# Altium PCB LST_UP.PcbDoc (part 5 of 6)
Units mil, origin at the board's own origin, x right, y up, seen from the top; angles counter-clockwise.
Board outline 4330.71 x 4330.71 mil, 2 copper layers (Top Layer, Bottom Layer), stack 50 mil thick; 469 components, 244 nets, 1341 pads, 140 vias.
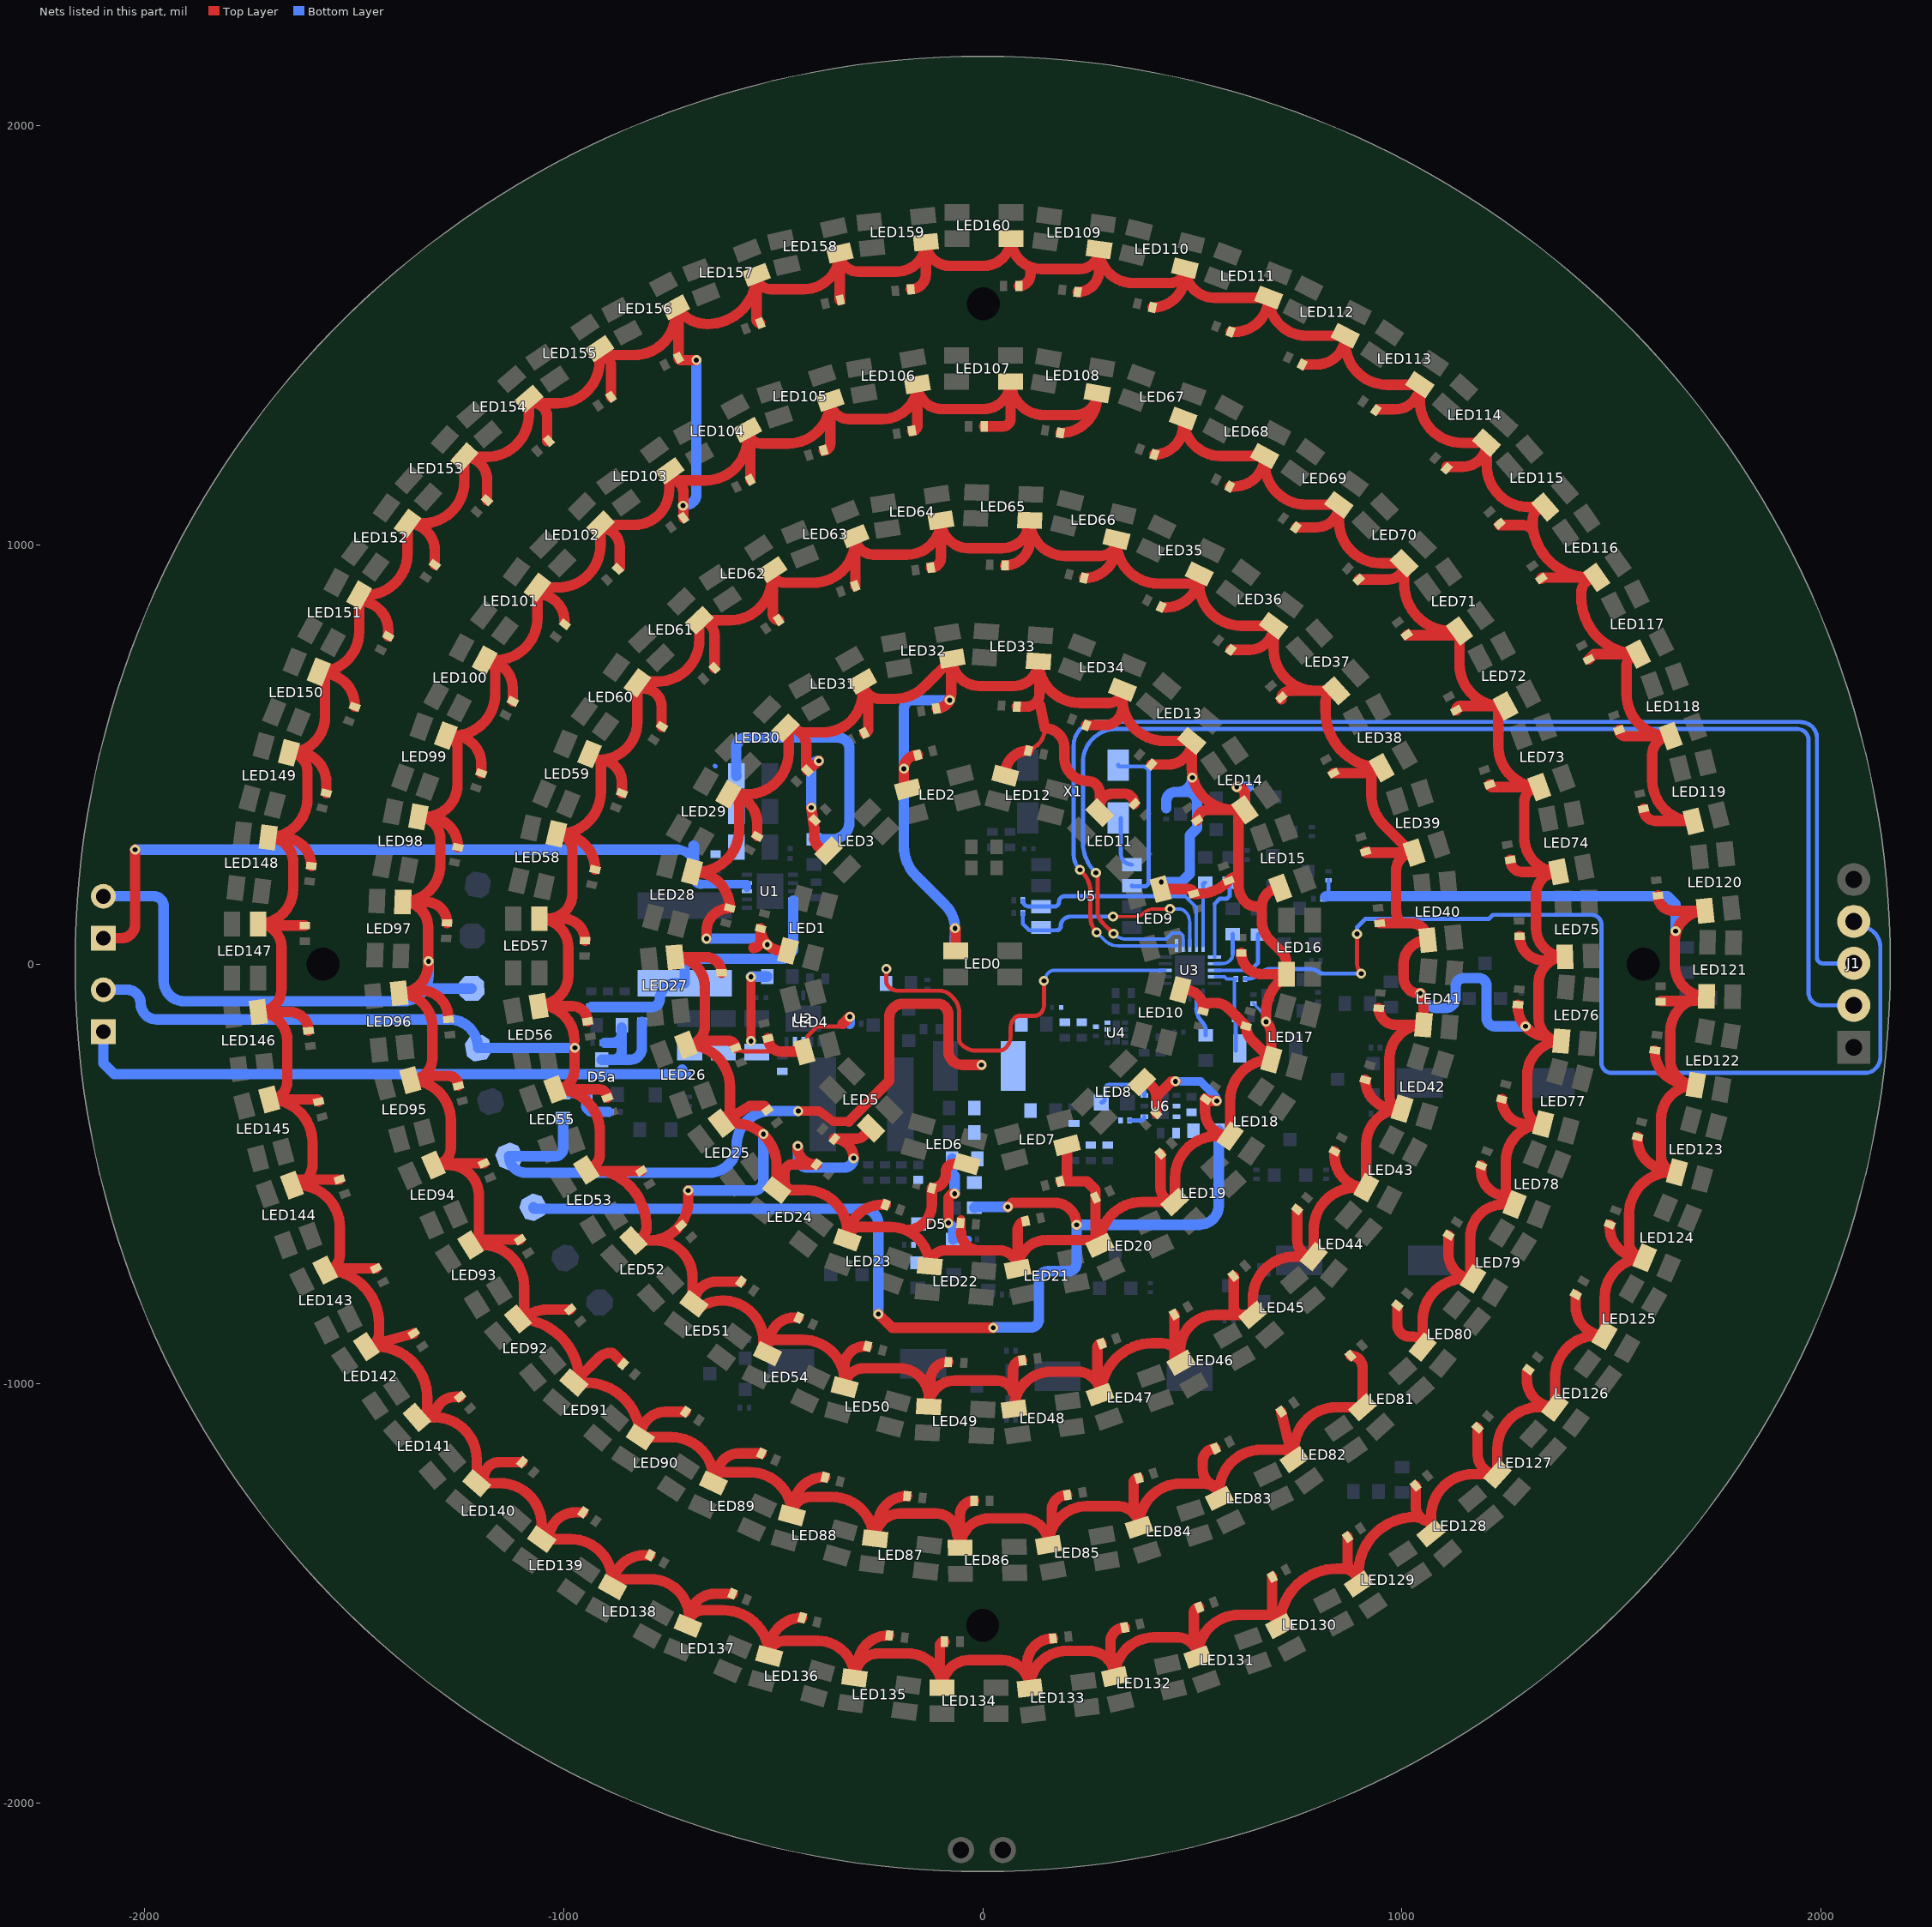
[diagram p4: the nets of this part, all layers, seen from the top]

## Via types
v1: diameter 23.62, hole 11.81, Top Layer to Bottom Layer, tented top, 92 vias
v2: diameter 23.62, hole 11.81, Top Layer to Bottom Layer, 48 vias

## Nets (pads, with @x,y where several pads share a name; then routed paths per layer and width w, separated by ;. In a path a pad name is that pad's centre, name@x,y a point inside that pad or via, vN(x,y) a via of type N, cw(c..) or ccw(c..) an arc to the next point about the centre after c; other vN are vias at no path point) (continued)
NetR23_1: R23.1 U6.4 | length 39.9
  Bottom Layer w10: R23.1@350.5,-372.28 377.2,-372.28 ccw(c377.2,-363.87) U6.4@385.61,-363.87
NetSB7_2: SB7.2 U3.8 | length 991.6
  Top Layer w10: v1@-230,-6 v1(-230,-11) -230,-39.51 ccw(c-209.51,-39.51) -224,-54 ccw(c-202.27,-32.27) -202.27,-63 -103,-63 cw(c-103,-101.63) -75.69,-74.31 -72,-78 cw(c-110.63,-116.63) -56,-116.63 -56,-178.76 ccw(c-38.93,-178.76) -51,-190.83 ccw(c-14.38,-154.22) -14.38,-206 38.1,-206 ccw(c38.1,-182.1) 55,-199 ccw(c27.07,-171.07) 66.57,-171.07 66.57,-150.77 cw(c98.77,-150.77) 76,-128 cw(c88.54,-140.54) 88.54,-122.81 123.98,-122.81 ccw(c123.98,-102.98) 138,-117 ccw(c118.69,-97.69) 146,-97.69 v1(146,-39.61)
  Bottom Layer w8: v1@150,-35.11 cw(c171,-35.11) 171,-14.11 U3.8@434.94,-14.11
  Bottom Layer w10: SB7.2@-230,-45.61 v1(-230,-11)
NetSB8_1: SB8.1 U3.2 | length 102.1
  Bottom Layer w8: 509.75,-105 U3.2@509.75,-73.16
  Bottom Layer w10: 509.75,-105 ccw(c555.01,-105) 523.01,-137 524,-138 cw(c504.69,-157.31) 532,-157.31 SB8.1@532,-169.11
NetSB9_1: SB9.1 U3.15 | length 153.1
  Bottom Layer w8: U3.15@525.5,44.95 SB9.1@525.5,189.39
  Bottom Layer w10: SB9.1@525.5,189.39 cw(c531,189.39) SB9.1@531,194.89
NetSB10_1: SB10.1 U3.16 | length 202.4
  Bottom Layer w8: U3.16@553.06,17.39 553.06,144.06
  Bottom Layer w10: 553.06,144.06 565.39,156.39 582.39,156.39 589,163 SB10.1@589,194.89
NetSB11_1: SB11.1 U3.17 | length 103.7
  Bottom Layer w8: U3.17@553.06,1.64 571.29,1.64 ccw(c571.29,28.09) 590,9.39 590.62,10.01 ; 590.63,10.02 ccw(c577.63,23) 596,23
  Bottom Layer w10: 596,23 SB11.1@596,72.39
NetSB12_1: SB12.1 U3.18 | length 175.5
  Bottom Layer w8: U3.18@555.06,-14.11 626.09,-14.11 ccw(c626.09,16.8) 647.95,-5.05
  Bottom Layer w10: 647.95,-5.05 657,4 SB12.1@657,71.39
OSC_IN: U5.1 X1.1 | length 126.5
  Bottom Layer w10: X1.1@329.54,349.39 329.54,264.17 ccw(c355.82,264.17) U5.1@355.82,237.89
OSC_OUT: U5.2 X1.4 | length 391.6
  Bottom Layer w10: X1.4@323.54,475.37 ccw(c326.91,475.37) 326.91,472 383,472 cw(c383,459) 396,459 396,196.39 cw(c385.61,196.39) 385.61,186 357.7,186 cw(c357.7,187.89) U5.2@355.82,187.89
RESET: C11.2 R19.1 SW1.1 U3.19 | length 225.8
  Bottom Layer w8: U3.19@555.06,-29.85 577.03,-29.85 581.79,-34.61 R19.1@604.17,-34.61 600.19,-38.59 600.19,-128.3 C11.2@603.5,-131.61
  Bottom Layer w10: SW1.1@603.07,-206.11 603.5,-205.68 C11.2@603.5,-131.61
RESET#: J1.4 R19.2 | length 2382.3
  Top Layer w10: v1@893,76.39 v1(893,72.39) 893,2.14 ccw(c927.14,2.14) v1(903,-22)
  Bottom Layer w10: R19.2@625.83,-34.61 630.07,-34.61 ccw(c630.07,9.62) 661.34,-21.66 cw(c687.07,-47.38) 663.11,-20 cw(c687.07,-47.38) 687.07,-11 777.2,-11 cw(c777.2,-58.8) 800.85,-17.26 ccw(c812.29,-5.82) 806.22,-20.82 ccw(c812.29,-5.82) 812.29,-22 v1(903,-22) ; v1(893,72.39) 893,88.64 912.75,108.39 1207.44,108.39 1217.2,118.15 1452.77,118.15 cw(c1452.77,94.93) 1456,117.93 cw(c1452.77,94.93) 1476,94.93 1476,-234.98 ccw(c1500,-234.98) 1500,-258.98 2109.92,-258.98 ccw(c2103,-221.24) 2141.37,-221.24 2141.37,41.02 ccw(c2092,41.02) J1.4@2092,90.39
RXD: J1.3 U3.11 | length 3109.9
  Top Layer w10: v1(232,225.39) 236.93,220.46 cw(c188.46,172) 257,172 257,112.21 ccw(c308.21,112.21) v2(272,76)
  Bottom Layer w8: v2(272,76) 290,58 ccw(c323.92,91.92) 323.92,43.95 461.5,43.95 U3.11@462.5,44.95
  Bottom Layer w10: v1(232,225.39) cw(c268.21,261.6) 217,261.6 217,522 cw(c273.39,522) 218.17,533.43 cw(c273.39,522) 261.96,577.22 cw(c273.39,522) 273.39,578.39 1953,578.39 ; 1953,577.39 cw(c1953,540.39) 1990,540.39 1990,16.39 ccw(c2004,16.39) 2004,2.39 J1.3@2078,2.39
SCL: R22.1 U3.14 U5.6 | length 538.8
  Bottom Layer w8: 483,162.63 509.75,135.89 U3.14@509.75,44.95
  Bottom Layer w10: R22.1@95.64,152.89 ccw(c110.64,152.89) 110.64,137.89 U5.6@139.28,137.89 170.5,137.89 ccw(c170.5,149.39) 182,149.39 cw(c195.24,149.39) 195.24,162.63 483,162.63
SDA: R21.1 U3.13 U5.5 | length 528.9
  Top Layer w8: v2(311,114) 364.51,114 ccw(c364.51,140.14) 383,121.66 cw(c407.97,96.69) 407.97,132 v2(447,132)
  Bottom Layer w8: v2(447,132) 468.51,132 cw(c468.51,111.51) 483,126 cw(c456.44,99.44) 494,99.44 U3.13@494,44.95
  Bottom Layer w10: R21.1@95.64,122.89 95.64,96.75 111,81.39 176.84,81.39 ccw(c176.84,90.55) 186,90.55 cw(c209.45,90.55) 209.45,114 v2(311,114)
TXD: J1.2 U3.12 | length 3152.9
  Top Layer w10: v1(270,218.39) cw(c260.34,208.73) 274,208.73 274,126.56 ccw(c311.56,126.56) 285,100 v2(312,73)
  Bottom Layer w8: v2(312,73) ccw(c343.51,104.51) 343.51,59.95 437.56,59.95 452,74.39 472,74.39 478.25,68.14 U3.12@478.25,44.95
  Bottom Layer w10: v1(270,218.39) 268.29,220.1 cw(c339,290.81) 239,290.81 239,482 cw(c318.39,482) 239.97,494.36 cw(c318.39,482) 250.23,522.7 cw(c318.39,482) 318.39,561.39 1943.51,561.39 cw(c1943.51,534.9) 1970,534.9 1970,-66.61 ccw(c2001,-66.61) 2001,-97.61 J1.2@2078,-97.61
V_BAT: P4.1 SB13.1 SB14.1 SB15.1 SB16.1 SB17.2 SB18.2 SB19.1 SW2.2 | length 1783.6
  Top Layer w22: v2(-440,-350) -390.65,-350 -356,-375 -319.73,-375
  Top Layer w25: -319.73,-375 -223,-278.27 -223,-127 cw(c-190,-127) -190,-94 -108,-94 cw(c-108,-120) -82,-120 -82,-206 ccw(c-48,-206) -48,-240 v2(-3,-240)
  Bottom Layer w25: SB16.1@-1001,-367 -1001,-439.15 cw(c-1019.47,-439.15) -1019.47,-457.61 P4.1@-1130,-457.61 ccw(c-1090.61,-457.61) -1090.61,-497 -653,-497 ccw(c-653,-431) -587.91,-441.94 ccw(c-653,-431) -587,-431 cw(c-506,-431) -561.43,-371.93 cw(c-506,-431) -506,-350 v2(-440,-350)
V_C1: D5.2 R33.2 SB15.2 | length 243
  Top Layer w25: v2@-82,-615.89 -82,-562 cw(c-67,-562) v2(-67,-547)
  Bottom Layer w10: D5.2@-70.13,-656.4 D5.2@-70.13,-656
  Bottom Layer w18: D5.2@-70.13,-656 R33.2@-34.83,-656
  Bottom Layer w25: v2@-81.5,-616.39 -70.13,-627.76 D5.2@-70.13,-656 ; SB15.2@-73,-464 -73,-499 -67,-505 v2(-67,-547)
  other v2: -82,-616.89
V_C2: D5a.2 R34a.2 SB16.2 | length 144
  Bottom Layer w25: SB16.2@-1001,-307 -949.74,-307 cw(c-949.74,-310.34) D5a.2@-946.4,-310.34 -946.4,-334.47 ccw(c-928.87,-334.47) -928.87,-352 -893,-352
V_LED_2: C20.1 C21.1 C22.1 L1.2 L7.2 U1.9 U1.10 | length 693.9
  Bottom Layer w10: C20.1@-934,-101.61 C20.1@-929.72,-105.89
  Bottom Layer w25: C20.1@-934,-101.61 C21.1@-894,-101.61 C22.1@-854,-101.61 -789.68,-101.61 ccw(c-789.68,-81.93) -770,-81.93 cw(c-733.21,-81.93) -733.21,-45.15 L1.2@-711,-45.15 -711,-5 -693,13 -473.39,13 -452.38,34.01 U1.10@-452.38,135.03 U1.9@-452.38,151.71
V_MCU: C23.1 C24.1 L4.2 R20.2 U4.7 U4.8
V_O1: C191.2 D5.3 L6.1 R34.2
V_O2: C192a.2 D5a.3 L7.1 R35a.2 | length 320.6
  Bottom Layer w25: D5a.3@-909,-227.66 -882.78,-227.66 ; -902,-187 -882,-187 ; -878,-187 -880,-187 -882,-187 ; C192a.2@-861,-151 -861,-166 ; L7.1@-813,-137 -813,-199.46 cw(c-841.2,-199.46) -841.2,-227.66 -882.78,-227.66 ; -882.78,-227.66 ccw(c-882.78,-205.88) -861,-205.88 -861,-166 ; -882,-187 ccw(c-882,-166) -861,-166
V_OUT_1: C4.2 C5.2 C6.2 R15.2 R18.1 SB6.1 U2.3 U2.4 | length 1677
  Top Layer w22: v2@-553,-182 v2(-553,-29.85)
  Bottom Layer w10: R15.2@-514.1,-29 R15.2@-514,-29.1
  Bottom Layer w25: SB6.1@-2098,-160.61 -2098,-236 -2072,-262 -707,-262 ; -717,-250.61 -717,-252.61 ccw(c-713,-252.61) -713,-256.61 ; v2(-553,-29.85) -552.25,-29.1 R15.2@-514,-29.1
  other v2: -553,-183
V_OUT_2: C1.2 C2.2 C3.2 R13.2 R17.1 SB5.1 U1.3 U1.4 | length 2512.5
  Top Layer w25: SB5.1@-2098,62.39 -2054.91,62.39 ccw(c-2054.91,95.3) -2022,95.3 v1(-2022,273.39)
  Bottom Layer w10: -639,473.89 ccw(c-637.5,473.89) -637.5,472.39 ; R13.2@-402.5,298.4 ccw(c-394.49,298.4) R13.2@-394.49,290.39
  Bottom Layer w20: -671.71,191.08 -562.62,191.08 -562.62,183
  Bottom Layer w22: -727.39,273.39 cw(c-727.39,235) -689,235 -689,208.37 ccw(c-671.71,208.37) -671.71,191.08
  Bottom Layer w25: v1(-2022,273.39) -727.39,273.39 ; -690,283 cw(c-690,282) -689,282 -689,235 ; C3.2@-587.5,449.4 -588,449.4 -588,518.06 cw(c-565.06,518.06) -565.06,541 -345.2,541 cw(c-345.2,513.8) -318,513.8 -318,339 cw(c-358.6,339) -358.6,298.4 R13.2@-402.5,298.4
V_TR: C14.1 C15.1 C16.1 L5.2 L9.1 R23.2 U6.6 | length 158.3
  Bottom Layer w10: L9.1@283.09,-329.61 ccw(c283.09,-321.7) 291,-321.7 291,-298.61 cw(c302,-298.61) 302,-287.61 378.22,-287.61 cw(c378.22,-295) 385.61,-295 U6.6@385.61,-312.69
V_TR_O: C28.2 C29.2 SB20.1 U6.2 U6.3
VCC: P6.1 SB19.2 SB20.2 | length 2591.2
  Top Layer w10: -6,-867 ccw(c-6,-866) -5,-866
  Top Layer w25: v2(-249,-834) -216,-867 -6,-867 v2(25,-867) ; v1(60,-578.61) 70,-568.61 171.07,-568.61 cw(c171.07,-621.54) v1(224,-621.54)
  Bottom Layer w10: v2(25,-867) cw(c26,-867) v2@26,-866
  Bottom Layer w25: P6.1@-1072,-579.61 ccw(c-1068.61,-579.61) -1068.61,-583 -285,-583 cw(c-285,-619) -249,-619 v2(-249,-834) ; SB19.2@-20,-580.61 -18,-578.61 v1(60,-578.61) ; v2@26,-866 115,-866 ccw(c115,-847) 134,-847 134,-754 cw(c156,-754) 156,-732 205,-732 ccw(c205,-713) 224,-713 v1(224,-621.54) 517.03,-621.54 517.96,-620.61 ccw(c517.96,-575.57) 563,-575.57 SB20.2@563,-396.61
VCC_L1: C30.2 C31.2 C32.2 C33.2 C34.2 C35.2 C36.2 C37.2 C38.2 C39.2 C40.2 C41.2 C42.2 C43.2 C44.2 C45.2 C46.2 C47.2 C48.2 C49.2 C50.2 C51.2 C52.2 C53.2 C54.2 C55.2 C56.2 C57.2 C58.2 C59.2 C60.2 C61.2 C62.2 C63.2 C64.2 C65.2 C66.2 C67.2 C68.2 C69.2 C70.2 C71.2 C72.2 C73.2 C74.2 C75.2 C76.2 C77.2 C78.2 C79.2 C80.2 C81.2 C82.2 C83.2 C84.2 C85.2 C86.2 C87.2 C88.2 C89.2 C90.2 C91.2 C92.2 C93.2 C94.2 C95.2 C96.2 C97.2 C98.2 C99.2 C100.2 C101.2 C102.2 C103.2 C104.2 C105.2 C106.2 C107.2 C108.2 C109.2 C190.2 LED0.1 LED1.1 LED2.1 LED3.1 LED4.1 LED5.1 LED6.1 LED7.1 LED8.1 LED9.1 LED10.1 LED11.1 LED12.1 LED13.1 LED14.1 LED15.1 LED16.1 LED17.1 LED18.1 LED19.1 LED20.1 LED21.1 LED22.1 LED23.1 LED24.1 LED25.1 LED26.1 LED27.1 LED28.1 LED29.1 LED30.1 LED31.1 LED32.1 LED33.1 LED34.1 LED35.1 LED36.1 LED37.1 LED38.1 LED39.1 LED40.1 LED41.1 LED42.1 LED43.1 LED44.1 LED45.1 LED46.1 LED47.1 LED48.1 LED49.1 LED50.1 LED51.1 LED52.1 LED53.1 LED54.1 LED55.1 LED56.1 LED57.1 LED58.1 LED59.1 LED60.1 LED61.1 LED62.1 LED63.1 LED64.1 LED65.1 LED66.1 LED67.1 LED68.1 LED69.1 LED70.1 LED71.1 LED72.1 LED73.1 LED74.1 LED75.1 LED76.1 LED77.1 LED78.1 LED79.1 LED80.1 P1.1 R1.1 R3.1 R5.1 RU1.1 SB6.2 | length 31605
  Top Layer w10: C55.2@-589.63,-199.34 ccw(c-569.66,-179.37) -569.66,-207.61 -507.99,-207.61 ccw(c-507.99,-192.53) -497.33,-203.19 ; LED4.1@-418.92,-208.03 -418.92,-172.53 -402.34,-155.96 ; -402.3,-155.96 -394.34,-148 -340.39,-148 -334,-141.61 ; 94.95,509.71 ccw(c94.95,563.08) 148.32,563.08
  Top Layer w22: -51.43,-639.57 C51.2@-51.43,-609 ; 83.38,-630.98 cw(c101.9,-630.98) C50.2@101.9,-612.46
  Top Layer w25: LED56.1@-1059.16,-99.64 -1036.76,-99.64 ; v2@-974,-199 -974,-252.44 cw(c-1019.86,-252.44) LED55.1@-1019.86,-298.3 LED55.1@-1013.55,-298.3 ; -974,-181.8 ccw(c-1059.16,-181.8) -1036.76,-99.64 ; C86.2@-948.71,56.92 ccw(c-1000.74,56.92) -1000.74,108.96 LED57.1@-1038.43,108.96 ; C85.2@-942.43,-136.17 ccw(c-978.96,-136.17) -978.96,-99.64 -1036.76,-99.64 ; C87.2@-924.68,226.44 ccw(c-1009.54,226.44) -1009.54,311.31 LED58.1@-1011,311.31 ; C84.2@-895.33,-318.23 ccw(c-915.25,-318.23) -915.25,-298.3 LED55.1@-1013.55,-298.3 ; C88.2@-860.77,408.42 -860.77,434.23 ccw(c-914.62,434.23) -914.62,488.08 ; LED60.1@-823.89,671.34 -823.89,578.81 cw(c-914.62,578.81) -914.62,488.08 ; C83.2@-814.61,-492.94 -899.91,-492.94 ; C89.2@-766.18,567.3 -766.18,615.03 ccw(c-809,615.03) -809,657.85 ccw(c-825.75,657.85) -825.75,674.6 -775.95,674.6 ccw(c-775.95,774.6) -675.95,774.6 LED61.1@-675.95,820.87 ; LED26.1@-708.1,-192.19 -703,-192.19 cw(c-703,-292.19) -603,-292.19 -603,-348.2 cw(c-618.66,-348.2) -603.11,-350.04 cw(c-618.66,-348.2) LED25.1@-618.66,-363.86 ; v2(-702.59,-539.69) -702.59,-565.41 cw(c-796,-565.41) -796,-658.82 ; LED28.1@-693.25,220.71 LED28.1@-690,220.71 ; LED51.1@-674,-817.61 cw(c-620.77,-899.57) LED54.1@-525.7,-922.19 ; v1(-659,61.39) -659,78.55 cw(c-603.42,78.55) C57.2@-603.42,134.13 ccw(c-690,134.13) LED28.1@-690,220.71 ; C90.2@-639.69,707.07 -639.69,784.61 ccw(c-675.95,784.61) LED61.1@-675.95,820.87 ; LED25.1@-623.02,-379.33 -556,-337.61 -521,-337.61 ; C56.2@-622.97,-20.14 ccw(c-660.27,-20.14) -660.27,17.17 LED27.1@-733.82,17.17 cw(c-733.82,-53.65) -663,-53.65 -663,-147.08 cw(c-708.1,-147.08) -679.89,-182.27 -606.7,-182.27 cw(c-606.7,-199.34) C55.2@-589.63,-199.34 ; LED25.1@-605,-379.33 -591.73,-379.33 cw(c-591.73,-479.33) -491.73,-479.33 LED24.1@-491.73,-538.35 -452,-538.35 ; C81.2@-576.82,-757 -635.93,-757 ccw(c-635.93,-809.91) LED51.1@-688.85,-809.91 -692.32,-806.44 -692.32,-746.93 ccw(c-780.44,-746.93) -780.44,-658.82 -796,-658.82 ; -547,39.39 ccw(c-547,56.26) -530.13,56.26 C32.2@-530.13,85.52 ccw(c-476.68,85.52) -476.68,32.07 LED1.1@-464.75,32.07 ; C58.2@-538,306.39 -538,336.87 ccw(c-606.56,336.87) LED29.1@-606.56,405.43 ; LED54.1@-521.4,-924.35 cw(c-492.66,-924.35) -507.83,-899.94 ; C33.2@-512,-176.61 ccw(c-480.58,-176.61) -497.33,-203.19 ccw(c-480.58,-176.61) -480.58,-208.03 LED4.1@-425.33,-208.03 ; C91.2@-486.58,821.47 cw(c-486.58,835.79) -500.91,835.79 LED62.1@-500.91,929.69 ; v1(-441,-433.61) ccw(c-441,-434.61) -442,-434.61 ccw(c-399.39,-434.61) C53.2@-399.39,-477.22 ; C80.2@-438.77,-842.79 -450.68,-842.79 ccw(c-450.68,-899.94) -507.83,-899.94 ; C59.2@-420.92,466.51 -420.92,521.93 ccw(c-463.04,521.93) -435.03,553.39 ; C59.2@-418.25,462.47 v1(-391,485.39) ; v1(-409,374) -404.47,343.42 -401.6,323.98 -402.08,305.16 ccw(c-367.65,305.16) LED3.1@-367.65,270.73 LED3.1@-367.65,273.46 ; C53.2@-396.58,-477.22 C53.2@-399.39,-477.22 ; -334,-141.61 -333.61,-141.61 v1(-317,-125) ; v1(-308,-462.61) ccw(c-354.92,-462.61) -354.92,-415.69 -300.93,-415.69 ccw(c-300.93,-390.57) -275.81,-390.57 LED5.1@-266.34,-390.57 ; C92.2@-304,902.39 -304,1010.39 LED63.1@-304.48,1010.39 ; C60.2@-282.52,551.79 ccw(c-282.52,561.05) -273.26,561.05 -273.26,644.38 ; C79.2@-274.87,-911.21 -282.39,-911.21 ccw(c-282.39,-958.62) -329.8,-958.62 -329.8,-985.81 ; C52.2@-231.38,-573.28 -239.02,-573.28 ccw(c-239.02,-657.3) LED23.1@-323.04,-657.3 ; LED2.1@-177.42,417.72 cw(c-177.42,428.3) -188,428.3 v1(-188,466.47) cw(c-154.87,466.47) C30.2@-154.87,499.6 ; -128.22,-1034.61 ccw(c-199.22,-1034.61) -199.22,-963.61 -284.07,-963.61 ccw(c-284.07,-1008.86) LED50.1@-329.32,-1008.86 -329.32,-995.61 ccw(c-429.32,-995.61) -329.8,-985.81 ; C93.2@-123.77,946.28 ccw(c-123.77,970.37) -99.68,970.37 LED64.1@-99.68,1058.77 ; C61.2@-110.63,610.6 ccw(c-110.63,646.23) v1(-78.78,630.28) ; C78.2@-82,-948.61 ccw(c-82,-991.03) -124.42,-991.03 -124.42,-1032.04 cw(c-66.29,-1055.17) -66.29,-992.61 34,-992.61 cw(c34,-1032.61) 72.3,-1021.07 72.3,-966.82 cw(c94.36,-966.82) C77.2@94.36,-944.76 ; v1@-81,631.39 ccw(c-79.89,631.39) -79.89,630.28 v1(-78.78,630.28) ; v2(-66,86) cw(c-69.46,82.54) -64.57,82.54 LED0.1@-64.57,32.1 ; -51.43,-639.57 ccw(c-9,-639.57) -9,-682 ; LED6.1@-38.29,-476.3 -69.69,-476.3 ccw(c-69.69,-494.61) -88,-494.61 -88,-500.49 cw(c-121.22,-500.49) C35.2@-121.22,-533.71 -121.22,-571.94 cw(c-183.37,-571.94) -183.37,-634.09 ; C94.2@53.49,951.74 ccw(c53.49,1010.7) 112.44,1010.7 LED65.1@112.44,1059.05 ; LED12.1@58,454.46 cw(c53.68,454.46) LED12.1@53.68,450.14 53.68,454.45 cw(c108.95,454.45) C41.2@108.95,509.71 ; LED48.1@74.73,-1060.8 cw(c163.92,-1060.8) 163.92,-971.61 225.83,-971.61 cw(c225.83,-1027.47) 273.41,-998.2 ; C62.2@81.45,614.78 104.51,614.78 ccw(c104.51,645.89) 124.38,621.95 ccw(c104.51,645.89) 135.63,645.89 135.63,701.2 ; 83.38,-630.98 LED21.1@83.38,-726.61 ; 137,618.39 148.32,563.08 cw(c148.32,516.4) 178,552.43 cw(c148.32,516.4) 195,516.4 195,492.39 ccw(c250,492.39) 250,437.39 cw(c250,408.05) 279.34,408.05 LED11.1@279.34,376.45 ; LED7.1@201,-431.61 201,-501.69 cw(c184.87,-501.69) C36.2@184.87,-517.82 248.82,-517.82 269.23,-538.23 C49.2@269.23,-556.43 LED20.1@269.23,-655.32 ; C95.2@242,921.39 ccw(c242,998.51) 319.12,998.51 LED66.1@319.12,1008.39 ; C63.2@247.15,570.46 291,570.46 ccw(c291,612.67) 333.21,612.67 333.21,633.06 ccw(c433.21,633.06) 433.21,533.06 LED13.1@498.47,533.06 ; LED20.1@266.5,-657.87 152.12,-657.87 ccw(c152.12,-726.61) LED21.1@83.38,-726.61 ; LED20.1@279.34,-666.9 cw(c379.34,-666.9) 379.34,-566.9 LED19.1@458.57,-566.9 ; LED11.1@282.77,362.04 LED11.1@279.34,362.04 LED11.1@279.34,376.45 ; C76.2@283.62,-904.94 ccw(c283.62,-915.15) 273.41,-915.15 273.41,-998.2 ; LED66.1@319.12,1014.59 LED66.1@319.12,1012.51 ; LED34.1@333.21,655.36 cw(c301.24,655.36) 301.24,623.39 232.71,623.39 cw(c232.71,722.86) 135.63,701.2 ; C40.2@361.84,382.8 ccw(c337.53,382.8) 337.53,407.11 310,407.11 ccw(c310,376.45) LED11.1@279.34,376.45 ; LED8.1@379.65,-280.95 cw(c379.65,-315.38) 414.08,-315.38 ; C42.2@402.17,476.5 441.91,476.5 ccw(c441.91,533.06) LED13.1@498.47,533.06 ; C96.2@409.38,1216.18 ccw(c409.38,1284.83) 478.04,1284.83 LED67.1@478.04,1302.08 ccw(c567.5,1302.08) 567.5,1212.62 LED68.1@672.41,1212.62 ; C37.2@414.08,-355.53 414.08,-315.38 ; C48.2@423.94,-452.61 423.94,-532.27 ccw(c458.57,-532.27) LED19.1@458.57,-566.9 ; LED9.1@426,179.37 492.18,179.37 cw(c492.18,168.13) C39.2@503.42,168.13 513.74,168.13 ccw(c513.74,268.13) 584.45,197.42 C44.2@586.65,199.62 587.87,200.83 cw(c610,178.7) 610,210 ; 436,851.39 436.66,851.39 ccw(c436.66,931.13) LED35.1@516.4,931.13 ; C75.2@456.96,-835.11 456.96,-915.02 ; v1(460,-279) 450.46,-279 414.08,-315.38 ; LED10.1@471.75,-60.72 482.17,-60.72 cw(c482.17,-104.34) C38.2@525.79,-104.34 ; C43.2@511.61,342.5 cw(c537.77,342.5) 537.77,368.66 598.47,368.66 cw(c598.47,468.66) 498.47,468.66 LED13.1@498.47,533.06 ; 525.79,-100.58 cw(c546.51,-121.31) 546.51,-92 555.37,-92 cw(c555.37,-134.74) 585.59,-104.52 C46.2@628.42,-147.35 ccw(c676.29,-147.35) 642.44,-181.19 LED17.1@688.49,-227.24 ; C47.2@530.39,-320.76 530.39,-350.12 ccw(c589.98,-350.12) LED18.1@589.98,-409.71 ; C47.2@535.23,-325.61 v1(558.39,-325.61) ; C97.2@589.33,1139.7 599.5,1139.7 ccw(c599.5,1212.62) LED68.1@672.41,1212.62 ; C65.2@591.77,750.39 636.54,750.39 ccw(c636.54,807.69) LED36.1@693.85,807.69 ; C74.2@598.74,-743.61 598.74,-816.03 ccw(c619,-816.03) LED45.1@619,-836.29 ; v1(606,423.39) cw(c606,403.83) 625.56,403.83 LED14.1@625.56,368.66 ccw(c625.56,359.1) LED14.1@616,359.1 ; 610,355 610,210 ; C45.2@617,26.89 ccw(c667.63,26.89) 624.78,-0.07 ccw(c667.63,26.89) 667.63,-23.74 LED16.1@724.8,-23.74 ; LED15.1@709.86,182.08 ccw(c709.86,138.16) 665.94,138.16 ; C66.2@712.38,632.26 cw(c732.72,632.26) 732.72,652.6 793.85,652.6 ; C98.2@748.16,1042.52 796.19,1042.52 ccw(c796.19,1096.28) LED69.1@849.95,1096.28 ; C73.2@750.11,-587.87 750.11,-657.52 ccw(c789.67,-657.52) LED44.1@789.67,-697.08 ; C67.2@836.97,456.21 927.43,456.21 927.43,403.36 ccw(c1027.43,403.36) 956.72,332.65 1023,266.37 916.14,266.37 cw(c916.14,268.8) C68.2@913.72,268.8 ; C72.2@839.31,-445.94 839.31,-456.93 ccw(c915,-456.93) LED43.1@915,-532.61 ; C99.2@897.08,918.05 966.97,918.05 ccw(c966.97,956.74) LED70.1@1005.66,956.74 1005.66,907.05 ccw(c1117.61,907.05) LED71.1@1117.61,795.1 ; C71.2@913,-275.61 ccw(c981.65,-275.61) 981.65,-344.26 LED42.1@1000.38,-344.26 ; C70.2@945,-104.75 ccw(c984.47,-104.75) 984.47,-144.22 1024.52,-144.22 ; C69.2@946.93,97.99 994.96,97.99 ; LED38.1@952.1,468.84 cw(c952.1,602.94) 818,602.94 818,627.51 cw(c843.09,627.51) LED37.1@843.09,652.6 793.85,652.6 ; C109.2@989.36,-816.59 989.36,-859.99 ccw(c1017,-859.99) 1017,-887.63 1024.2,-887.63 cw(c1024.2,-912.82) LED80.1@1049.39,-912.82 1049.39,-849.88 cw(c1149.39,-849.88) 1149.39,-749.88 LED79.1@1169.41,-749.88 ; LED70.1@998.35,956.74 949.95,956.74 cw(c949.95,1056.74) 849.95,1056.74 LED69.1@849.95,1096.28 ; C100.2@1011.87,785.15 1127.46,785.15 ccw(c1127.46,795.1) LED71.1@1137.4,795.1 1137.4,716.19 ccw(c1237.4,716.19) LED72.1@1237.4,616.19 ; LED39.1@1029.37,266.37 ccw(c1029.37,223) 986,223 986,133.74 ccw(c1061.82,133.74) 994.96,97.99 ; C108.2@1111.39,-646.99 1111.39,-691.87 ; C101.2@1129.69,606.06 cw(c1139.82,606.06) 1139.82,616.19 LED72.1@1237.4,616.19 ; C107.2@1189.07,-480.18 1189.07,-492.92 ccw(c1248,-492.92) 1248,-551.85 ; C102.2@1209.33,429.01 ccw(c1215.25,429.01) 1215.25,423.08 LED73.1@1327.86,423.08 ; C106.2@1238.21,-321.8 ccw(c1297.34,-321.8) 1297.34,-380.93 LED77.1@1337.25,-380.93 ; C103.2@1258.53,249.23 ccw(c1287.24,249.23) 1287.24,220.52 LED74.1@1373.94,220.52 ; C105.2@1276.77,-96.14 1276.77,-101.56 ccw(c1346.87,-101.56) 1346.87,-171.66 ; C104.2@1280.65,66.9 ccw(c1338.1,66.9) 1338.1,9.45 1357.82,9.45 ; LED57.1@-1038.43,108.96 ccw(c-1038.43,168.39) -979,168.39 -979,273.13 ccw(c-1017.17,273.13) LED58.1@-1017.17,311.31 LED58.1@-1011,311.31 ; LED57.1@-1038.43,108.96 LED57.1@-1057.9,108.96 cw(c-1057.9,39.66) -988.6,39.66 -988.6,-26.07 cw(c-1059.16,-26.07) -1059.16,-96.64 cw(c-1059.16,-181.8) -1036.76,-99.64 ; LED55.1@-1013.55,-298.3 cw(c-1013.55,-398.3) -913.55,-398.3 -913.55,-453.08 cw(c-946.84,-453.08) -946.84,-486.37 ccw(c-940.27,-486.37) -940.27,-492.94 -899.91,-492.94 ; LED58.1@-1011,311.31 ccw(c-1011,411.31) -911,411.31 -911,474.53 ccw(c-938.14,474.53) -914.62,488.08 ; -899.91,-492.94 cw(c-942.35,-626.73) -802,-626.73 cw(c-834.09,-626.73) -834.09,-658.82 -796,-658.82 ; LED28.1@-690,220.71 -681.08,220.71 ccw(c-681.08,320.71) -581.08,320.71 -581.08,379.94 ccw(c-606.56,379.94) LED29.1@-606.56,405.43 ; LED61.1@-675.95,820.87 -602.91,820.87 ccw(c-602.91,920.87) -502.91,920.87 -502.91,940.47 ccw(c-472.83,940.47) LED62.1@-500.91,929.69 ; LED29.1@-606.56,405.43 -563.04,405.43 ccw(c-563.04,505.43) -463.04,505.43 -463.04,564.05 cw(c-463.04,521.93) -435.03,553.39 ; -507.83,-899.94 cw(c-492.66,-924.35) -492.66,-895.61 -429.32,-895.61 cw(c-429.32,-995.61) -329.8,-985.81 ; LED62.1@-500.91,929.69 ccw(c-472.83,940.47) -472.83,910.39 -404.48,910.39 ccw(c-404.48,1010.39) LED63.1@-304.48,1010.39 ; -452,-538.35 cw(c-452,-517.58) -472.77,-517.58 -472.77,-496.29 cw(c-453.7,-496.29) -453.7,-477.22 C53.2@-399.39,-477.22 ; -452,-538.35 -423.04,-538.35 cw(c-423.04,-638.35) -323.04,-638.35 LED23.1@-323.04,-657.3 ; -435.03,553.39 -381,553.39 ccw(c-381,647.86) -286.53,647.86 LED31.1@-286.53,674.74 ccw(c-245.18,674.74) -273.26,644.38 ; LED23.1@-323.04,-657.3 cw(c-292.35,-657.3) -292.35,-626.61 -220,-626.61 cw(c-220,-720) -183.37,-634.09 ; LED63.1@-304.48,1010.39 LED63.1@-304.48,1021.74 ccw(c-260.13,1021.74) -260.13,977.39 -181.06,977.39 ccw(c-181.06,1058.77) LED64.1@-99.68,1058.77 ; -273.26,644.38 ccw(c-245.18,674.74) -245.18,633.39 -210.02,633.39 ccw(c-210.02,733.39) -139.31,662.68 LED32.1@-73.01,728.97 ; -183.37,-634.09 cw(c-220,-720) -167.3,-642.9 cw(c-220,-720) LED22.1@-126.61,-720 cw(c-88.61,-720) -88.61,-682 -9,-682 ; LED64.1@-99.68,1058.77 ccw(c-33.55,1058.77) -33.55,992.64 46.03,992.64 ccw(c46.03,1059.05) 105.93,1030.38 105.93,1052.54 cw(c112.44,1052.54) LED65.1@112.44,1059.05 ; v1(-78.78,630.28) ccw(c-110.63,646.23) -75,646.23 -75,709.57 ccw(c-168.6,728.97) LED32.1@-73.01,728.97 ; LED32.1@-73.01,728.97 ccw(c-8.08,728.97) -8.08,664.04 74.42,664.04 ccw(c74.42,722.86) LED33.1@133.24,722.86 ccw(c232.71,722.86) 135.63,701.2 ; -9,-682 38.77,-682 cw(c38.77,-726.61) LED21.1@83.38,-726.61 ; LED65.1@112.44,1059.05 ccw(c197.11,1059.05) 197.11,974.39 281,974.39 ccw(c281,1012.51) LED66.1@319.12,1012.51 ; 273.41,-998.2 cw(c225.83,-1027.47) 281.69,-1027.47 cw(c405.55,-1027.47) 405.55,-903.61 426.37,-903.61 cw(c426.37,-950.31) 456.96,-915.02 ; LED66.1@319.12,1008.39 ccw(c419.12,1008.39) 419.12,908.39 493.66,908.39 ccw(c493.66,931.13) LED35.1@516.4,931.13 ; LED66.1@319.12,1008.39 LED66.1@319.12,1012.51 ; 456.96,-915.02 456.96,-934.2 ccw(c473.06,-934.2) LED46.1@473.06,-950.31 cw(c473.06,-948.24) 471,-948.24 471,-920.61 cw(c555.32,-920.61) 555.32,-836.29 LED45.1@619,-836.29 ; LED19.1@458.57,-566.9 458.57,-509.71 cw(c558.57,-509.71) 558.57,-409.71 LED18.1@589.98,-409.71 ; LED35.1@516.4,931.13 516.4,907.69 ccw(c616.4,907.69) 616.4,807.69 LED36.1@693.85,807.69 ; LED18.1@589.98,-409.71 589.98,-325.76 cw(c688.49,-325.76) LED17.1@688.49,-227.24 ; 610,210 610,189.76 ccw(c668.53,189.76) 627.14,148.38 ccw(c651.81,173.04) 651.81,138.16 665.94,138.16 ; LED45.1@619,-836.29 LED45.1@644.55,-836.29 644.55,-797.08 cw(c744.55,-797.08) 744.55,-697.08 LED44.1@789.67,-697.08 ; 665.94,138.16 665.94,104 ccw(c730.97,104) 684.99,58.01 713,30 cw(c684.52,1.52) 724.8,1.52 LED16.1@724.8,-23.74 ; LED68.1@672.41,1212.62 672.41,1196.28 ccw(c772.41,1196.28) 772.41,1096.28 LED69.1@849.95,1096.28 ; LED17.1@688.49,-227.24 688.49,-167.16 ccw(c645.84,-167.16) v2(676,-137) 676,-113.96 cw(c776,-113.96) 705.29,-43.25 LED16.1@724.8,-23.74 ; LED36.1@693.85,807.69 693.85,752.6 ccw(c793.85,752.6) 793.85,652.6 ; LED44.1@789.67,-697.08 789.67,-632.61 cw(c889.67,-632.61) 889.67,-532.61 LED43.1@915,-532.61 ; LED43.1@915,-532.61 915,-429.64 cw(c1000.38,-429.64) LED42.1@1000.38,-344.26 ; 994.96,97.99 1021.75,97.99 cw(c1021.75,57.93) LED40.1@1061.82,57.93 ccw(c1061.82,0.11) 1004,0.11 1004,-30.31 ccw(c1044.97,-30.31) 1016,-59.28 ccw(c1039.82,-35.46) 1039.82,-69.15 v1(1044,-69.15) cw(c1026.16,-86.98) 1051.39,-86.98 LED41.1@1051.39,-144.22 1024.52,-144.22 ; LED42.1@1000.38,-344.26 cw(c1000.38,-314.25) 970.37,-314.25 970.37,-225.24 cw(c1051.39,-225.24) 1034.7,-145.96 cw(c1034.7,-115.25) 1024.52,-144.22 ; 1111.4,-692.87 ccw(c1169.41,-691.87) LED79.1@1169.41,-749.88 ; 1111.4,-692.87 cw(c1169.41,-691.87) 1111.39,-691.87 ; 1111.39,-692.87 1111.39,-691.87 ; LED79.1@1169.41,-749.88 cw(c1169.41,-743.48) 1163,-743.48 1163,-651.61 cw(c1241.79,-651.61) 1241.79,-572.82 LED78.1@1268.98,-572.82 cw(c1268.98,-551.85) 1248,-551.85 ; LED72.1@1237.4,616.19 LED72.1@1247.08,616.19 ccw(c1247.08,599.11) 1230,599.11 1230,520.94 ccw(c1327.86,520.94) LED73.1@1327.86,423.08 ; 1248,-551.85 1248,-470.17 cw(c1337.25,-470.17) LED77.1@1337.25,-380.93 ; LED73.1@1327.86,423.08 ccw(c1327.86,387.22) 1292,387.22 1292,302.46 ccw(c1373.94,302.46) LED74.1@1373.94,220.52 ; LED77.1@1337.25,-380.93 cw(c1337.25,-342.68) 1299,-342.68 1299,-264.61 cw(c1380.39,-264.61) LED76.1@1380.39,-183.22 cw(c1380.39,-128.83) 1346.87,-171.67 ; 1346.87,-171.67 cw(c1380.39,-128.83) 1326,-128.83 1326,-45.39 cw(c1389.17,-45.39) 1357.82,9.45 ; 1357.82,9.45 cw(c1389.17,-45.39) LED75.1@1389.17,17.78 cw(c1389.17,86.95) 1320,86.95 1320,166.58 cw(c1373.94,166.58) LED74.1@1373.94,220.52
  Bottom Layer w8: RU1.1@646,-93.65 676,-123.65 v2(676,-137)
  Bottom Layer w20: v1(460,-279) 520,-279 552.58,-311.58 cw(c538.54,-325.61) v1(558.39,-325.61)
  Bottom Layer w25: SB6.2@-2098,-60.61 -2041,-60.61 cw(c-2041,-92.61) -2009,-92.61 ccw(c-1970,-92.61) -1970,-131.61 -1272,-131.61 cw(c-1272,-199.61) P1.1@-1204,-199.61 -973,-199.61 v2(-973,-199) ; v2(-702.59,-539.69) -546.69,-539.69 ccw(c-546.69,-516) -523,-516 v2(-523,-405) ; v1(-659,61.39) -528.39,61.39 v2(-514,47) ; v1(-441,-433.61) -441,-461.61 ccw(c-418,-461.61) -418,-484.61 -330,-484.61 ccw(c-330,-462.61) v1(-308,-462.61) ; v1(-409,374) -409,467.39 cw(c-391,467.39) v1(-391,485.39) ; R5.1@-316.83,-141.61 v1@-316.83,-130.17 ; v1(-78.78,630.28) -168.11,630.28 ccw(c-168.11,610.39) -188,610.39 v1(-188,466.47) -188,281.42 ccw(c-88,281.42) -158.71,210.71 -89,141 cw(c-144.53,85.47) -66,85.47 C190.2@-66,59.5 ; v1(426,196.39) 474,196.39 494,216.39 494,308.01 511.31,325.32 511.31,387.09 ccw(c487.01,387.09) 487.01,411.39 466,411.39 ccw(c466,445.39) v1(500,445.39) ; R1.1@438,372.39 438,389.39 ; 438,391.39 438,389.39 ; 460,411.39 ccw(c460,389.39) 438,389.39 ; v1(606,423.39) 634,423.39 ; v1(1044,-69.15) ccw(c1070.2,-69.15) 1051.67,-87.67 1055,-91 ccw(c1087.86,-58.14) 1087.86,-104.61 1103,-104.61 ccw(c1103,-79.61) 1128,-79.61 1128,-53.61 cw(c1149,-53.61) 1149,-32.61 1183,-32.61 cw(c1183,-51.61) 1202,-51.61 1202,-127.61 ccw(c1222,-127.61) 1222,-147.61 v1(1295,-147.61)
VCC_L2: C110.2 C111.2 C112.2 C113.2 C114.2 C115.2 C116.2 C117.2 C118.2 C119.2 C120.2 C121.2 C122.2 C123.2 C124.2 C125.2 C126.2 C127.2 C128.2 C129.2 C130.2 C131.2 C132.2 C133.2 C134.2 C135.2 C136.2 C137.2 C138.2 C139.2 C140.2 C141.2 C142.2 C143.2 C144.2 C145.2 C146.2 C147.2 C148.2 C149.2 C150.2 C151.2 C152.2 C153.2 C154.2 C155.2 C156.2 C157.2 C158.2 C159.2 C160.2 C161.2 C162.2 C163.2 C164.2 C165.2 C166.2 C167.2 C168.2 C169.2 C170.2 C171.2 C172.2 C173.2 C174.2 C175.2 C176.2 C177.2 C178.2 C179.2 C180.2 C181.2 C182.2 C183.2 C184.2 C185.2 C186.2 C187.2 C188.2 C189.2 LED81.1 LED82.1 LED83.1 LED84.1 LED85.1 LED86.1 LED87.1 LED88.1 LED89.1 LED90.1 LED91.1 LED92.1 LED93.1 LED94.1 LED95.1 LED96.1 LED97.1 LED98.1 LED99.1 LED100.1 LED101.1 LED102.1 LED103.1 LED104.1 LED105.1 LED106.1 LED107.1 LED108.1 LED109.1 LED110.1 LED111.1 LED112.1 LED113.1 LED114.1 LED115.1 LED116.1 LED117.1 LED118.1 LED119.1 LED120.1 LED121.1 LED122.1 LED123.1 LED124.1 LED125.1 LED126.1 LED127.1 LED128.1 LED129.1 LED130.1 LED131.1 LED132.1 LED133.1 LED134.1 LED135.1 LED136.1 LED137.1 LED138.1 LED139.1 LED140.1 LED141.1 LED142.1 LED143.1 LED144.1 LED145.1 LED146.1 LED147.1 LED148.1 LED149.1 LED150.1 LED151.1 LED152.1 LED153.1 LED154.1 LED155.1 LED156.1 LED157.1 LED158.1 LED159.1 LED160.1 P2.1 R7.1 R9.1 SB5.2 | length 32792.8
  Top Layer w25: LED149.1@-1655.25,504.71 cw(c-1655.25,460.46) -1611,460.46 -1611,395.95 cw(c-1704.26,395.95) LED148.1@-1704.26,302.68 ; C177.2@-1617,92.39 -1707.94,92.39 ; C176.2@-1608.51,-158.25 ccw(c-1653.02,-158.25) -1653.02,-113.73 LED146.1@-1728,-113.73 ; C178.2@-1601.75,234.75 ccw(c-1669.68,234.75) -1669.68,302.68 LED148.1@-1704.26,302.68 ; C175.2@-1584.16,-327.58 ccw(c-1589.55,-327.58) -1589.55,-322.19 LED145.1@-1701.67,-322.19 ; C179.2@-1566.21,408.26 -1566.21,434.79 ccw(c-1637.89,434.79) -1637.89,506.47 ccw(c-1655.25,590.95) -1569,590.95 -1569,682.63 ccw(c-1583.98,682.63) LED150.1@-1573.7,693.52 ; C174.2@-1534.33,-513.23 -1614.01,-513.23 ; C180.2@-1498.07,614.54 -1498.07,617.89 ccw(c-1573.7,617.89) LED150.1@-1573.7,693.52 ; C173.2@-1447.4,-725.13 LED143.1@-1552.13,-725.13 ; C181.2@-1418.03,782.57 -1418.03,796.93 ccw(c-1487.49,796.93) LED151.1@-1487.49,866.39 ; C172.2@-1357.08,-880.1 LED142.1@-1454.72,-907.34 ; v1@-1323.09,-0.42 cw(c-1391.82,-0.42) -1360.58,-61.64 ; v1@-1323.09,7.39 -1323.09,88.78 ccw(c-1383.31,88.78) LED97.1@-1383.31,149 ; C182.2@-1307.13,953.36 -1307.13,986.89 ccw(c-1372.1,986.89) LED152.1@-1372.1,1051.86 ; C126.2@-1278.03,98.86 ccw(c-1328.17,98.86) -1328.17,149 LED97.1@-1383.31,149 ; C125.2@-1275,-127.61 ccw(c-1340.97,-127.61) -1340.97,-61.64 -1360.58,-61.64 ; C127.2@-1251.84,279.42 ccw(c-1324.26,279.42) -1324.26,351.84 LED98.1@-1330.55,351.84 ; C124.2@-1250.93,-289.74 ccw(c-1274.53,-289.74) -1274.53,-266.13 -1334.71,-266.13 ; C171.2@-1247.14,-1031.63 -1258.35,-1031.63 ccw(c-1258.35,-1080.48) -1307.19,-1080.48 ; LED140.1@-1207.19,-1224.61 -1207.19,-1180.48 ccw(c-1307.19,-1180.48) -1307.19,-1080.48 ; C128.2@-1196.35,456.16 -1196.35,478.77 ccw(c-1263,478.77) LED99.1@-1263,545.42 ; LED140.1@-1190,-1237.66 -1152.05,-1237.66 cw(c-1152.05,-1337.66) -1052.05,-1337.66 LED139.1@-1052.05,-1371.1 LED139.1@-1035,-1371.1 ; -1190,-1224.61 cw(c-1152.86,-1224.61) -1152.86,-1187.47 C170.2@-1098.96,-1187.47 ; C123.2@-1190,-474.82 LED94.1@-1292.79,-474.82 ; C183.2@-1182.62,1107.14 -1182.62,1156.5 ccw(c-1236.68,1156.5) LED153.1@-1236.68,1210.56 ; C129.2@-1121.31,627.72 -1121.31,658.89 ccw(c-1188.23,658.89) LED100.1@-1188.23,725.8 ; LED92.1@-1110,-846.05 cw(c-1110,-993.28) LED91.1@-962.98,-985.45 ; C122.2@-1103.8,-656.82 -1203.39,-656.82 ; C184.2@-1039.04,1248.53 -1039.04,1305.45 ccw(c-1071.98,1305.45) LED154.1@-1071.98,1338.39 ; C130.2@-997.87,819.01 ccw(c-1062.3,819.01) LED101.1@-1062.3,883.45 ; C121.2@-983.78,-823.27 -1039,-823.27 ccw(c-1039,-901.05) -1094,-846.05 -1094,-769.37 ccw(c-1194,-769.37) -1194,-669.37 LED93.1@-1221.84,-669.37 cw(c-1209.29,-669.37) -1209.29,-656.82 -1203.39,-656.82 ; LED91.1@-975.19,-997.66 LED91.1@-962.98,-985.45 ; C169.2@-953.15,-1307 -970.9,-1307 ccw(c-970.9,-1371.1) LED139.1@-1035,-1371.1 ; LED91.1@-947.48,-997.66 cw(c-947.48,-1127.93) LED90.1@-817.21,-1127.93 ; LED102.1@-912.01,1048.4 -831.19,1048.4 ccw(c-831.19,1131.59) -748,1131.59 LED103.1@-748,1158.39 ; -899,1453.39 -832.39,1453.39 ccw(c-832.39,1553.39) -732.39,1553.39 LED156.1@-732.39,1567.24 cw(c-732.39,1560.52) LED156.1@-725.67,1560.52 ; C185.2@-886.66,1353.73 -886.66,1425.97 ccw(c-914.08,1425.97) -914.08,1453.39 -914.08,1438.39 cw(c-1014.08,1438.39) -1014.08,1338.39 LED154.1@-1071.98,1338.39 ; C131.2@-866,946.39 -866,995.08 ccw(c-912.01,995.08) -912.01,1041.09 -912.01,999.24 cw(c-1012.01,999.24) -1012.01,899.24 LED101.1@-1062.3,899.24 LED101.1@-1062.3,883.45 ; C120.2@-861.91,-948.52 -881.58,-928.86 ccw(c-887,-934.28) -887,-926.61 ccw(c-887,-967.98) -916.25,-938.73 LED91.1@-962.98,-985.45 ; C168.2@-793.18,-1409.64 -807.93,-1409.64 ccw(c-807.93,-1485.11) LED138.1@-883.39,-1485.11 ; -757.81,-1067.53 C119.2@-709.52,-1067.53 ; -756.81,-1067.53 ccw(c-756.81,-1127.93) LED90.1@-817.21,-1127.93 ; C132.2@-714.03,1065.26 -714.03,1124.42 ccw(c-748,1124.42) LED103.1@-748,1158.39 ; v1(-683,1441.39) -719.98,1441.39 cw(c-719.98,1447.07) C186.2@-725.67,1447.07 LED156.1@-725.67,1560.52 ; C167.2@-597.03,-1501.38 -638.92,-1501.38 ccw(c-638.92,-1562.43) LED137.1@-699.98,-1562.43 ; C133.2@-554.52,1155.79 -554.52,1255.13 ; C187.2@-530.73,1530.02 cw(c-530.73,1538.87) -539.58,1538.87 LED157.1@-539.58,1644.49 ; C118.2@-527.77,-1166.79 -582.33,-1166.79 ccw(c-582.33,-1217.02) -632.56,-1217.02 ; C166.2@-430.78,-1558.51 ccw(c-430.78,-1637.22) -509.49,-1637.22 LED136.1@-509.49,-1649.92 ; C134.2@-379.74,1226.11 ccw(c-379.74,1242.07) -363.78,1242.07 LED105.1@-363.78,1342.39 ; C117.2@-375.78,-1223.51 -379.19,-1223.51 ccw(c-379.19,-1294.78) -450.47,-1294.78 ; C188.2@-339.7,1584.87 cw(c-339.7,1586.26) -341.09,1586.26 LED158.1@-341.09,1696.61 ; LED87.1@-260.42,-1369.87 ccw(c-359.68,-1369.87) -359.68,-1270.61 -411.23,-1270.61 ccw(c-411.23,-1314.54) -450.47,-1294.78 ; LED87.1@-256.3,-1369.87 cw(c-196.03,-1369.87) -250.36,-1343.8 ; C165.2@-222.9,-1601.04 -226.13,-1601.04 ccw(c-226.13,-1673.01) -298.1,-1673.01 ; C116.2@-180.36,-1268.36 ccw(c-180.36,-1338.36) -250.36,-1338.36 -250.36,-1343.8 ; C189.2@-171.6,1610.32 ccw(c-171.6,1646.39) -135.54,1646.39 LED159.1@-135.54,1722.71 ; C135.2@-168.78,1272.6 ccw(c-168.78,1285.37) -156.01,1285.37 LED106.1@-156.01,1383.97 ; C164.2@-91.5,-1615.61 ccw(c-91.5,-1626.31) -102.2,-1626.31 -102.2,-1697.06 ; C115.2@-20.5,-1279.61 ccw(c-20.5,-1313.21) -54.1,-1313.21 LED86.1@-54.1,-1391.64 ; C136.2@3.5,1283.39 48.13,1283.39 ccw(c48.13,1301.82) 66.57,1301.82 LED107.1@66.57,1390.29 ; C138.2@86.5,1618.39 ccw(c86.5,1645.89) 114,1645.89 114,1659.39 ; C163.2@167.64,-1607.87 ccw(c167.64,-1669.49) 106.01,-1669.49 106.01,-1698.65 ; C137.2@185,1267.54 ccw(c185,1355.72) 273.19,1355.72 LED108.1@273.19,1362.55 cw(c221.03,1362.55) 221.03,1310.39 146.46,1310.39 cw(c146.46,1390.29) LED107.1@66.57,1390.29 ; C114.2@201.78,-1265.82 ccw(c201.78,-1303.05) 164.55,-1303.05 164.55,-1348.3 ; C139.2@226.32,1603.81 ccw(c226.32,1655.1) 277.61,1655.1 LED109.1@277.61,1705.6 ; C162.2@338.97,-1581.91 ccw(c338.97,-1616.25) 304.64,-1616.25 304.64,-1665.18 ; C113.2@372.41,-1225.33 ccw(c372.41,-1237.69) 360.04,-1237.69 360.04,-1309.27 ; C140.2@404.95,1566.91 ccw(c404.95,1644.69) 482.73,1644.69 LED110.1@482.73,1660.59 ; C161.2@516.62,-1533.94 ccw(c516.62,-1546.76) 503.8,-1546.76 503.8,-1625.19 ; C112.2@555.37,-1154.72 ccw(c555.37,-1185.09) 525,-1185.09 525,-1205.39 ccw(c565.12,-1205.39) 565.12,-1245.51 ; C141.2@591.27,1508.76 600.68,1508.76 ccw(c600.68,1590.21) LED111.1@682.13,1590.21 ; C160.2@690.67,-1461.3 690.67,-1550.8 ccw(c695.22,-1550.8) 691.6,-1553.57 ; C111.2@711.85,-1066.82 LED82.1@736.92,-1170.62 ; C142.2@770,1430.99 796.6,1430.99 ccw(c796.6,1499.39) LED112.1@865,1499.39 ; C159.2@870.66,-1365.96 870.66,-1427.56 ccw(c896.29,-1427.56) 896.29,-1453.19 ; C110.2@877.5,-933.37 cw(c877.5,-962.07) 906.21,-962.07 LED81.1@906.21,-1056.7 843.27,-1056.7 ccw(c843.27,-1156.7) 743.27,-1156.7 739.47,-1156.7 739.47,-1181.17 LED82.1@736.92,-1170.62 ; C143.2@943.9,1324.04 984.19,1324.04 ccw(c984.19,1382.5) LED113.1@1042.64,1382.5 ; 1032.83,-1293.89 C158.2@1032.83,-1244.5 ; 1032.83,-1292.89 ccw(c1069.55,-1292.89) 1047.94,-1322.58 ; C144.2@1106.75,1187.01 1145.11,1187.01 ccw(c1145.11,1244.07) LED114.1@1202.17,1244.07 ; C157.2@1180.62,-1105.36 1180.62,-1169.29 ccw(c1227.68,-1169.29) LED127.1@1227.68,-1216.36 ; C145.2@1233.14,1047.73 1288.29,1047.73 cw(c1288.29,1018.7) 1312,1035.46 cw(c1288.29,1018.7) 1313.72,1032.72 ; C156.2@1297.87,-971.61 1297.87,-988.77 ccw(c1365.3,-988.77) LED126.1@1365.3,-1056.21 ; C146.2@1332.61,919.5 cw(c1335.77,919.5) 1335.77,922.66 LED116.1@1448.23,922.66 ; 1414.75,-817.53 C155.2@1414.75,-788.63 ; 1414.75,-816.53 ccw(c1483.56,-816.53) LED125.1@1483.56,-885.34 ; C147.2@1446,727.39 1458.76,740.15 LED117.1@1563.57,740.15 ; C154.2@1495.77,-629.12 C154.2@1495.77,-621.64 ; C154.2@1495.77,-628.12 ccw(c1564.56,-628.12) LED124.1@1564.56,-696.91 ; C148.2@1518.33,559.01 ccw(c1532.91,559.01) 1532.91,544.42 LED118.1@1636,544.42 ; C153.2@1562.21,-411.48 1562.21,-416.74 ccw(c1634.87,-416.74) 1634.87,-489.39 ; C149.2@1576.48,371.23 ccw(c1605.6,371.23) 1605.6,342.11 LED119.1@1682.23,342.11 ; C152.2@1603.43,-209.39 C152.2@1603.43,-205.93 ; C152.2@1603.43,-208.39 ccw(c1678.7,-208.39) 1678.7,-283.67 ; C150.2@1610.93,163.99 ccw(c1647,163.99) 1647,127.93 LED120.1@1723.82,127.93 ccw(c1723.82,55.11) 1651,55.11 1651,-0.85 ccw(c1726.78,-0.85) LED121.1@1726.78,-76.62 cw(c1717.01,-76.62) 1717.01,-86.39 1686.78,-86.39 ccw(c1726.78,-163.4) 1640,-163.4 1640,-227.07 ccw(c1700.74,-227.07) 1678.7,-283.67 ; C151.2@1618,-87.39 1688.78,-87.39 ; LED119.1@1695.44,341.22 cw(c1695.44,439.28) LED119.1@1682.23,342.11 ; LED146.1@-1728,-113.73 cw(c-1728,-182.73) -1659,-182.73 -1659,-279.53 cw(c-1701.67,-279.53) LED145.1@-1701.67,-322.19 ; LED146.1@-1728,-113.73 ccw(c-1728,-58.74) -1673,-58.74 -1673,40.57 ccw(c-1728.9,40.57) -1707.94,92.39 ; -1707.94,92.39 -1724.82,92.39 cw(c-1724.82,96.47) LED147.1@-1728.9,96.47 ccw(c-1728.9,180.37) -1645,180.37 -1645,243.42 ccw(c-1704.26,243.42) LED148.1@-1704.26,302.68 ; LED145.1@-1701.67,-322.19 cw(c-1701.67,-424.86) -1599,-424.86 -1599,-477.99 cw(c-1647.86,-477.99) -1614.01,-513.23 ; -1614.01,-513.23 -1634.24,-513.23 ccw(c-1634.24,-526.85) LED144.1@-1647.86,-526.85 -1633.87,-526.85 cw(c-1633.87,-626.85) -1533.87,-626.85 -1533.87,-694.56 cw(c-1568.6,-694.56) LED143.1@-1552.13,-725.13 ; LED150.1@-1573.7,693.52 ccw(c-1583.98,682.63) LED150.1@-1583.98,697.6 ccw(c-1583.98,794.08) -1487.49,794.08 LED151.1@-1487.49,866.39 ; LED143.1@-1552.13,-725.13 -1564.44,-725.13 ccw(c-1564.44,-729.28) LED143.1@-1568.6,-729.28 cw(c-1568.6,-857.7) -1440.18,-857.7 -1440.18,-881.55 cw(c-1470.32,-881.55) LED142.1@-1454.72,-907.34 ; LED151.1@-1487.49,866.39 LED151.1@-1487.49,880.78 -1472.1,880.78 ccw(c-1472.1,980.78) -1372.1,980.78 LED152.1@-1372.1,1051.86 ; LED142.1@-1454.72,-907.34 LED142.1@-1470.32,-911.69 -1447.78,-911.69 cw(c-1447.78,-1034.47) -1325,-1034.47 -1325,-1055.59 cw(c-1349.89,-1055.59) LED141.1@-1349.89,-1080.48 -1307.19,-1080.48 ; LED97.1@-1383.31,149 ccw(c-1383.31,238.31) -1294,238.31 -1294,299.69 ccw(c-1346.15,299.69) LED98.1@-1346.15,351.84 LED98.1@-1330.55,351.84 ; LED152.1@-1372.1,1051.86 -1336.68,1051.86 ccw(c-1336.68,1151.86) -1236.68,1151.86 LED153.1@-1236.68,1210.56 ; -1360.58,-61.64 cw(c-1391.82,-0.42) LED96.1@-1391.82,-69.15 cw(c-1391.82,-147.96) -1313,-147.96 -1313,-223.53 cw(c-1365.67,-223.53) -1334.71,-266.13 ; -1334.71,-266.13 cw(c-1365.67,-223.53) LED95.1@-1365.67,-276.19 cw(c-1365.67,-372.86) -1269,-372.86 -1269,-437.61 cw(c-1310,-437.61) LED94.1@-1292.79,-474.82 ; LED98.1@-1330.55,351.84 ccw(c-1330.55,429.39) -1253,429.39 -1253,517.73 ccw(c-1280.69,517.73) LED99.1@-1280.69,545.42 LED99.1@-1263,545.42 ; LED94.1@-1292.79,-474.82 -1306.21,-474.82 ccw(c-1306.21,-478.61) LED94.1@-1310,-478.61 -1275,-478.61 cw(c-1275,-551.61) -1229.66,-494.4 cw(c-1275,-551.61) -1202,-551.61 -1202,-649.53 cw(c-1221.84,-649.53) -1203.39,-656.82 ; LED99.1@-1263,545.42 ccw(c-1263,645.42) -1163,645.42 -1163,700.57 ccw(c-1188.23,700.57) LED100.1@-1188.23,725.8 ; LED153.1@-1236.68,1210.56 -1182.87,1210.56 ccw(c-1182.87,1310.56) -1082.87,1310.56 LED154.1@-1082.87,1349.28 ccw(c-1071.98,1349.28) LED154.1@-1071.98,1338.39 ; LED100.1@-1188.23,725.8 -1162.3,725.8 ccw(c-1162.3,825.8) -1062.3,825.8 LED101.1@-1062.3,883.45 ; LED139.1@-1035,-1371.1 -983.39,-1371.1 cw(c-983.39,-1471.1) -883.39,-1471.1 LED138.1@-883.39,-1485.11 ; LED138.1@-883.39,-1485.11 cw(c-864.9,-1485.11) -864.9,-1466.61 -793,-1466.61 cw(c-793,-1559.64) -699.98,-1559.64 LED137.1@-699.98,-1562.43 ; LED90.1@-817.21,-1127.93 -742.37,-1127.93 cw(c-742.37,-1227.93) -642.37,-1227.93 LED89.1@-642.37,-1237.13 cw(c-616.85,-1237.13) -632.56,-1217.02 ; LED103.1@-748,1158.39 -748,1175.66 cw(c-746.48,1175.66) LED103.1@-746.48,1177.18 ccw(c-723.69,1177.18) -723.69,1154.39 -661.39,1154.39 ccw(c-661.39,1254.39) -561.39,1254.39 LED104.1@-561.39,1275.24 cw(c-561.39,1268.37) -554.52,1268.37 -554.52,1255.13 ; LED156.1@-725.67,1560.52 -717.9,1552.75 ccw(c-656.68,1613.97) -656.68,1527.39 ccw(c-656.68,1644.49) LED157.1@-539.58,1644.49 ; LED137.1@-699.98,-1562.43 cw(c-666.14,-1577.75) -666.14,-1540.61 -618.8,-1540.61 cw(c-618.8,-1649.92) LED136.1@-509.49,-1649.92 ; -632.56,-1217.02 cw(c-616.85,-1237.13) -616.85,-1211.61 -555.16,-1211.61 cw(c-555.16,-1311.61) -455.16,-1311.61 LED88.1@-455.16,-1314.54 cw(c-411.23,-1314.54) -450.47,-1294.78 ; -554.52,1255.13 ccw(c-528.54,1275.24) -528.54,1242.39 -463.78,1242.39 ccw(c-463.78,1342.39) LED105.1@-363.78,1342.39 ; LED157.1@-539.58,1644.49 ccw(c-505.47,1644.49) -505.47,1610.39 -427.31,1610.39 ccw(c-427.31,1696.61) LED158.1@-341.09,1696.61 ; LED136.1@-509.49,-1649.92 cw(c-473.19,-1649.92) -473.19,-1613.61 -393.95,-1613.61 cw(c-393.95,-1701.82) LED135.1@-305.73,-1701.82 cw(c-247.52,-1701.82) -298.1,-1673.01 ; LED105.1@-363.78,1342.39 LED105.1@-363.78,1345.54 ccw(c-318.63,1345.54) -318.63,1300.39 -239.6,1300.39 ccw(c-239.6,1383.97) LED106.1@-156.01,1383.97 ; LED158.1@-341.09,1696.61 ccw(c-296.87,1696.61) -296.87,1652.39 -205.85,1652.39 ccw(c-205.85,1722.71) LED159.1@-135.54,1722.71 ; -298.1,-1673.01 cw(c-247.52,-1701.82) -247.52,-1643.61 -178.93,-1643.61 cw(c-178.93,-1725.41) -102.2,-1697.06 ; -250.36,-1343.8 cw(c-196.03,-1369.87) -233.42,-1322.61 cw(c-196.03,-1369.87) -196.03,-1309.61 -112.56,-1309.61 cw(c-112.56,-1360.8) -61.37,-1360.8 cw(c-123.13,-1391.64) LED86.1@-54.1,-1391.64 ; LED106.1@-156.01,1383.97 ccw(c-96.43,1383.97) -96.43,1324.39 0.67,1324.39 ccw(c0.67,1390.29) LED107.1@66.57,1390.29 ; LED159.1@-135.54,1722.71 ccw(c-79.22,1722.71) -79.22,1666.39 2.67,1666.39 ccw(c2.67,1731.29) LED160.1@67.57,1731.29 ccw(c140.46,1731.29) 140.46,1658.39 230.4,1658.39 ccw(c230.4,1705.6) LED109.1@277.61,1705.6 ; -102.2,-1697.06 cw(c-178.93,-1725.41) LED134.1@-97.13,-1725.41 cw(c-31.34,-1725.41) -31.34,-1659.61 45.13,-1659.61 cw(c45.13,-1726.61) 106.01,-1698.65 ; LED86.1@-54.1,-1391.64 cw(c15.93,-1391.64) 15.93,-1321.61 93.86,-1321.61 cw(c93.86,-1384.78) LED85.1@157.03,-1384.78 cw(c249.19,-1384.78) 164.55,-1348.3 ; 106.01,-1698.65 cw(c45.13,-1726.61) LED133.1@112.12,-1726.61 cw(c201.12,-1726.61) 201.12,-1637.61 253.26,-1637.61 cw(c253.26,-1699.27) 304.64,-1665.18 ; 164.55,-1348.3 cw(c249.19,-1384.78) 249.19,-1292.61 322.61,-1292.61 cw(c322.61,-1342.98) 360.04,-1309.27 ; LED109.1@277.61,1705.6 ccw(c357.82,1705.6) 357.82,1625.39 447.53,1625.39 ccw(c447.53,1660.59) LED110.1@482.73,1660.59 ; 304.64,-1665.18 cw(c253.26,-1699.27) LED132.1@314.92,-1699.27 cw(c408.58,-1699.27) 408.58,-1605.61 465.7,-1605.61 cw(c465.7,-1652.47) 503.8,-1625.19 ; 360.04,-1309.27 cw(c322.61,-1342.98) LED84.1@372.98,-1342.98 372.98,-1338.61 cw(c472.98,-1338.61) 472.98,-1238.61 528.98,-1238.61 cw(c528.98,-1273.96) LED83.1@564.33,-1273.96 564.33,-1258.05 cw(c664.33,-1258.05) 564.34,-1256.7 cw(c664.33,-1258.05) 565.12,-1245.51 ; LED110.1@482.73,1660.59 ccw(c553.1,1660.59) 553.1,1590.21 LED111.1@682.13,1590.21 ; 503.8,-1625.19 cw(c465.7,-1652.47) LED131.1@512.55,-1651.61 ; LED131.1@512.55,-1651.61 cw(c465.7,-1652.47) LED131.1@512.56,-1652.47 LED131.1@512.56,-1651.61 ; LED131.1@512.56,-1651.61 cw(c612.56,-1651.61) 612.56,-1551.61 681.54,-1551.61 cw(c681.54,-1578.46) 691.6,-1553.57 ; 565.12,-1245.51 cw(c664.33,-1258.05) 664.33,-1158.05 716.35,-1158.05 cw(c716.35,-1181.17) LED82.1@736.92,-1170.62 ; LED111.1@682.13,1590.21 ccw(c772.96,1590.21) 772.96,1499.39 LED112.1@865,1499.39 ; 691.6,-1553.57 ccw(c695.22,-1550.8) 695.22,-1555.36 cw(c681.54,-1578.46) LED130.1@708.39,-1578.46 cw(c845.24,-1578.46) 845.24,-1441.61 859.65,-1441.61 cw(c859.65,-1478.25) LED129.1@896.29,-1478.25 896.29,-1453.19 ; LED112.1@865,1499.39 865,1482.5 ccw(c965,1482.5) 965,1382.5 LED113.1@1042.64,1382.5 ; 896.29,-1453.19 cw(c1030.87,-1453.19) 1030.87,-1318.61 cw(c1030.87,-1357.29) 1047.94,-1322.58 ; LED113.1@1042.64,1382.5 1042.64,1344.07 ccw(c1142.64,1344.07) 1142.64,1244.07 LED114.1@1202.17,1244.07 ; 1047.94,-1322.58 ccw(c1069.55,-1292.89) 1053.48,-1325.91 ccw(c1069.55,-1292.89) 1069.55,-1329.61 1069.55,-1316.36 cw(c1169.55,-1316.36) 1169.55,-1216.36 LED127.1@1227.68,-1216.36 ; LED114.1@1202.17,1244.07 1202.17,1190.78 ccw(c1302.17,1190.78) 1302.17,1090.78 LED115.1@1341.89,1090.78 ccw(c1341.89,1060.89) 1312,1060.89 1312,1043.36 ccw(c1448.23,1059.89) 1313.72,1032.72 ; LED127.1@1227.68,-1216.36 1227.68,-1156.21 cw(c1327.68,-1156.21) 1327.68,-1056.21 LED126.1@1365.3,-1056.21 ; 1313.72,1032.72 ccw(c1448.23,1059.89) LED116.1@1448.23,922.66 ; LED126.1@1365.3,-1056.21 1365.3,-985.34 cw(c1465.3,-985.34) 1465.3,-885.34 LED125.1@1483.56,-885.34 ; LED116.1@1448.23,922.66 LED116.1@1464.56,922.66 ccw(c1464.56,886.1) 1428,886.1 1428,875.72 ccw(c1563.57,875.72) LED117.1@1563.57,740.15 ; LED125.1@1483.56,-885.34 1483.56,-795.47 cw(c1579.14,-795.47) LED124.1@1579.14,-699.89 cw(c1579.14,-662.75) LED124.1@1564.57,-696.91 ; LED117.1@1563.57,740.15 ccw(c1563.57,712.57) 1536,712.57 1536,644.42 ccw(c1636,644.42) LED118.1@1636,544.42 ; LED124.1@1564.57,-696.91 cw(c1579.14,-662.75) 1542,-662.75 1542,-595.93 cw(c1642,-595.93) 1642,-495.93 LED123.1@1656.25,-495.93 cw(c1656.25,-457.68) 1634.87,-489.39 ; 1634.87,-489.39 cw(c1656.25,-457.68) 1618,-457.68 1618,-370.55 cw(c1700.74,-370.55) LED122.1@1700.74,-287.81 cw(c1700.74,-227.07) 1678.7,-283.67 ; LED118.1@1636,544.42 LED118.1@1641.55,544.42 ccw(c1641.55,500.26) 1597.38,500.26 1597.38,439.28 ccw(c1695.44,439.28) LED119.1@1682.23,342.11
  Bottom Layer w10: 825,170.74 R9.1@825,200.56
  Bottom Layer w25: SB5.2@-2098,162.39 -1978,162.39 cw(c-1978,138.39) -1954,138.39 -1954,-39 ccw(c-1905,-39) -1905,-88 -1383.39,-88 ccw(c-1383.39,-26.61) -1330.4,-57.61 ; v1(-1322,7.39) -1322,-26.61 cw(c-1383.39,-26.61) -1330.4,-57.61 ; P2.1@-1219,-57.61 -1330.4,-57.61 ; v1(-715,1094.39) cw(c-713,1094.39) -713,1096.39 -708,1096.39 ccw(c-708,1121.39) -683,1121.39 v1(-683,1441.39) ; 818,161.39 819.31,162.7 1633.69,162.7 1653,143.39 v1(1653,79.39)